# Altium PCB Mach_IO.PcbDoc (part 2 of 2)
Units mil, origin at the board's own origin, x right, y up, seen from the top; angles counter-clockwise.
Board outline 4965 x 4380 mil, 4 copper layers (Top Layer, Int1 (GND), Int2 (PWR), Bottom Layer), stack 53.912 mil thick; 148 components, 136 nets, 543 pads, 238 vias.
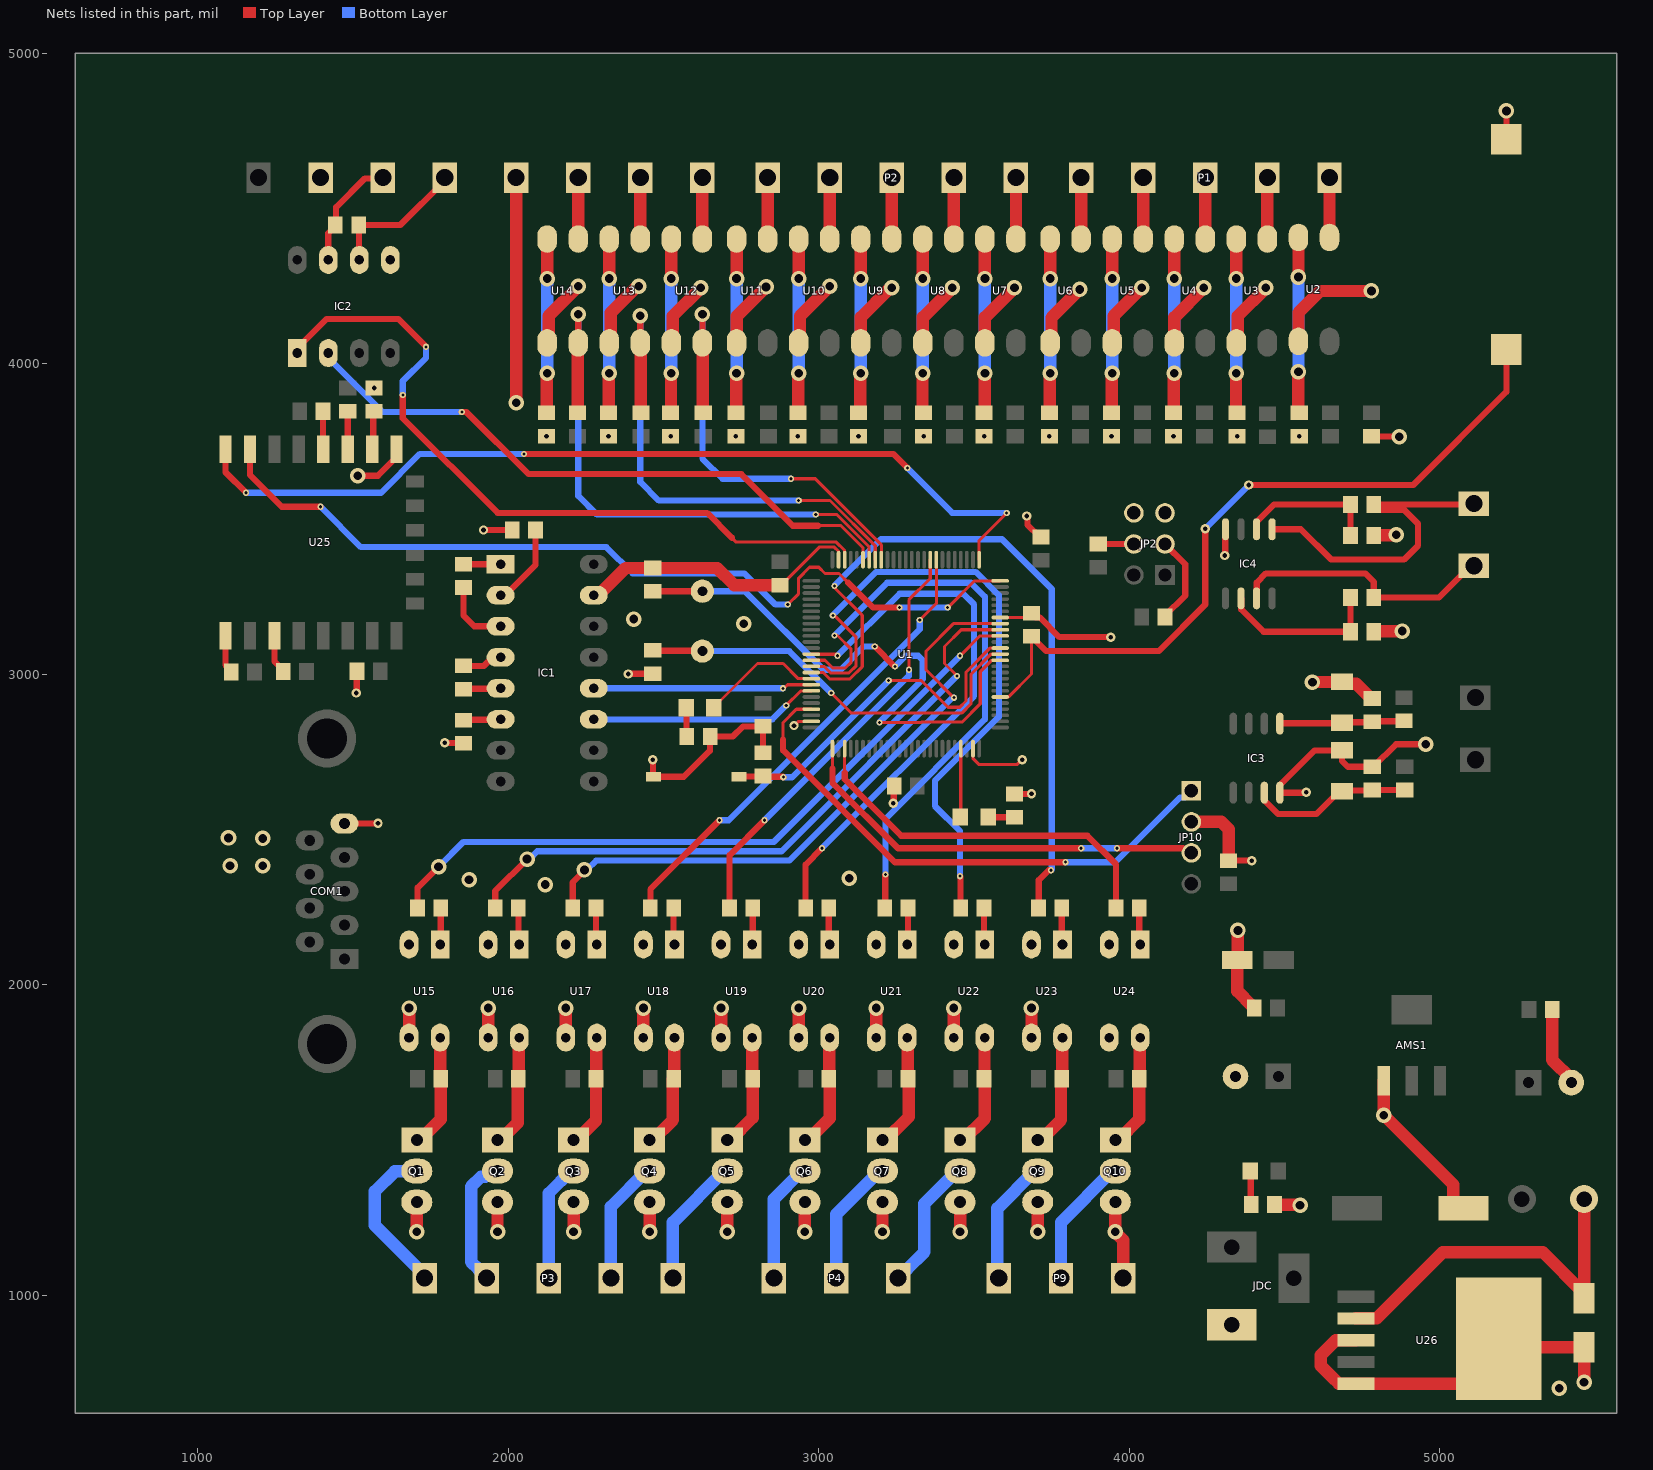
[diagram p4: the nets of this part, all layers, seen from the top]

## Via types
v1: diameter 20, hole 10, Top Layer to Bottom Layer, 63 vias
v2: diameter 50, hole 28, Top Layer to Bottom Layer, 54 vias
v3: diameter 50, hole 28, Top Layer to Int1 (GND), 44 vias
v4: diameter 30, hole 15, Top Layer to Int1 (GND), 29 vias
v5: diameter 30 (per signal layer), hole 15, Top Layer to Int2 (PWR), 19 vias
v6: diameter 50 (per signal layer), hole 28, Top Layer to Int2 (PWR), 15 vias
v7: diameter 30, hole 15, Top Layer to Bottom Layer, 10 vias
v8: diameter 50, hole 50, Top Layer to Bottom Layer, 2 vias
v9: diameter 20 (per signal layer), hole 10, Top Layer to Int2 (PWR), 1 vias
v10: diameter 50, hole 28, Top Layer to Int2 (PWR), 1 vias

## Nets (pads, with @x,y where several pads share a name; then routed paths per layer and width w, separated by ;. In a path a pad name is that pad's centre, name@x,y a point inside that pad or via, vN(x,y) a via of type N, cw(c..) or ccw(c..) an arc to the next point about the centre after c; other vN are vias at no path point) (continued)
DI_11: R25.1 U1.42 U12.4 | length 1523.2
  Top Layer w10: v1(2910,3630) 2988.39,3630 3201.26,3417.13 U1.42@3201.26,3369.13
  Top Layer w20: U12.4@2625,4067.68 v2(2625,4160) ; R25.1@2626.3,3843.53 R25.1@2627.61,3842.23
  Top Layer w40: U12.4@2625,4067.68 2626.3,4066.37 R25.1@2626.3,3843.53
  Bottom Layer w20: v2(2625,4160) 2625,3695 2690,3630 v1(2910,3630)
DI_12: R26.1 U1.43 U13.4 | length 1735.7
  Top Layer w10: v1(2935,3560) 3035.76,3560 3181.57,3414.19 U1.43@3181.57,3369.13
  Top Layer w20: U13.4@2425,4067.68 v2(2425,4155)
  Top Layer w40: U13.4@2425,4067.68 2426.3,4066.37 2426.3,3843.53 R26.1@2427.61,3842.23
  Bottom Layer w20: v2(2425,4155) 2425,3620 2485,3560 v1(2935,3560)
DI_13: R27.1 U1.44 U14.4 | length 1950.6
  Top Layer w10: v1(2990,3515) 3058.14,3515 3161.54,3411.59 3161.54,3369.48 U1.44@3161.89,3369.13
  Top Layer w20: U14.4@2225,4067.68 v2(2225,4160)
  Top Layer w40: R27.1@2222.61,3842.23 2223.8,3843.43 2223.8,4066.48 U14.4@2225,4067.68
  Bottom Layer w20: v2(2225,4160) 2225,3575 2285,3515 v1(2990,3515)
DO1: P3.5 Q1.2 | length 498.4
  Bottom Layer w40: Q1.2@1705,1400 1704.29,1399.29 1634.29,1399.29 1570,1335 1570,1224.84 P3.5@1730,1064.84
DO2: P3.4 Q2.2 | length 425.6
  Bottom Layer w40: P3.4@1930,1055 1930,1064.84 1910.63,1084.21 1903.43,1084.21 1880,1107.64 1880,1350 1911.79,1381.79 1925.97,1381.79 1944.18,1400 Q2.2@1965,1400
DO3: P3.3 Q3.2 | length 383.2
  Bottom Layer w40: P3.3@2130,1055 2130,1328.58 2201.42,1400 Q3.2@2210,1400
DO4: P3.2 Q4.2 | length 402.6
  Bottom Layer w40: P3.2@2330,1055 2330,1285 2445,1400 Q4.2@2455,1400
DO5: P3.1 Q5.2 | length 423.3
  Bottom Layer w40: P3.1@2530,1055 2530,1235 2695,1400 Q5.2@2705,1400
DO6: P4.3 Q6.2 | length 392.3
  Bottom Layer w40: P4.3@2855,1055 2855,1310 2945,1400 Q6.2@2955,1400
DO7: P4.2 Q7.2 | length 412.8
  Bottom Layer w40: P4.2@3055.5,1055 3055.5,1260.5 3195,1400 Q7.2@3205,1400
DO8: P4.1 Q8.2 | length 439.3
  Bottom Layer w40: P4.1@3255.5,1055 3255.5,1064.84 3274.87,1084.21 3284.71,1084.21 3340,1139.5 3340,1295 3445,1400 Q8.2@3455,1400
DO9: P9.3 Q9.2 | length 406.6
  Bottom Layer w40: P9.3@3579.5,1055 3575,1059.5 3575,1280 3695,1400 Q9.2@3705,1400
DO10: P9.2 Q10.2 | length 423.3
  Bottom Layer w40: P9.2@3780,1055 3780,1235 3945,1400 Q10.2@3955,1400
DO_1: R28.2 U1.16 | length 2277.9
  Top Layer w10: v1(3455,3060) 3519.06,3124.06 U1.16@3584.13,3124.06
  Top Layer w20: R28.2@1707.43,2247.39 1707.43,2312.43 v2(1775,2380)
  Bottom Layer w20: v2(1775,2380) 1855,2460 2855,2460 v1(3455,3060)
DO_2: R30.2 U1.17 | length 2142.4
  Top Layer w10: v1(3445,2995) 3405,3035 3405,3090 3458.74,3143.74 U1.17@3584.13,3143.74
  Top Layer w20: R30.2@1957.43,2247.39 1957.43,2302.43 v2(2060,2405)
  Bottom Layer w20: v2(2060,2405) 2068.12,2405 2093.12,2430 2880,2430 v1(3445,2995)
DO_3: R32.2 U1.18 | length 2021.1
  Top Layer w10: v1(3435,2925) 3345,3015 3345,3075 3433.43,3163.43 U1.18@3584.13,3163.43
  Top Layer w20: R32.2@2207.43,2247.39 2207.43,2329.79 2245,2367.37 v2(2245,2370)
  Bottom Layer w20: v2(2245,2370) 2253.12,2370 2283.12,2400 2905,2400 3430,2925 v1(3435,2925)
DO_4: R34.2 U1.33 | length 1520.8
  Top Layer w10: v1(3325,3175) 3378.43,3228.43 U1.33@3378.43,3369.13
  Top Layer w20: R34.2@2457.43,2247.39 2457.43,2307.43 v1(2680,2530)
  Bottom Layer w20: v1(2680,2530) 2710,2530 3325,3145 v1(3325,3175)
DO_5: R36.2 U1.34 | length 1389.5
  Top Layer w10: v1(3290,3015) 3290,3240 3358.74,3308.74 U1.34@3358.74,3369.13
  Top Layer w20: R36.2@2712.43,2247.39 2712.43,2417.43 v1(2825,2530)
  Bottom Layer w20: v1(2825,2530) 3290,2995 v1(3290,3015)
DO_6: R38.2 U1.63 | length 1825.9
  Top Layer w10: U1.63@2975.87,3065 2976.21,3064.65 3055.35,3064.65 v1(3060,3060)
  Top Layer w20: R38.2@2957.43,2247.39 2957.43,2387.43 v1(3010,2440)
  Bottom Layer w20: v1(3010,2440) 3500,2930 3500,3225 3465,3260 3260,3260 v1(3060,3060)
DO_7: R40.2 U1.64 | length 1970.2
  Top Layer w10: U1.64@2975.87,3045.31 3019.94,3045.31 3044.25,3021 3086,3021 3104,3039 3104,3081 3060,3125 v1(3050,3125)
  Top Layer w20: R40.2@3212.43,2247.39 3213.71,2248.68 3213.71,2353.71 v1(3215,2355)
  Bottom Layer w20: v1(3050,3125) 3220,3295 3490,3295 3535,3250 3535,2855 3215,2535 v1(3215,2355)
DO_8: R42.2 U1.65 | length 2110
  Top Layer w10: U1.65@2975.87,3025.63 2976.21,3025.28 3017.34,3025.28 3037.63,3005 3097.37,3005 3120,3027.63 3120,3120 3050,3190 v1(3045,3190)
  Top Layer w20: v1(3455,2350) 3456.21,2348.79 3456.21,2248.61 R42.2@3457.43,2247.39
  Bottom Layer w20: v1(3045,3190) 3185,3330 3505,3330 3580,3255 3580,2863.23 3374,2657.23 3374,2576 3455,2495 v1(3455,2350)
DO_9: R44.2 U1.66 | length 2364.6
  Top Layer w10: U1.66@2975.87,3005.94 3014.06,3005.94 3035,2985 3100,2985 3140,3025 3140,3190 3050,3280 v1(3050,3285)
  Top Layer w20: R44.2@3707.43,2247.39 3708.71,2248.68 3708.71,2337.35 3740.37,2369 v1(3747.77,2369)
  Bottom Layer w20: v1(3050,3285) 3200,3435 3590,3435 3750,3275 3750,2371.23 v1(3747.77,2369)
DO_10: R46.2 U1.78 | length 1227.1
  Top Layer w10: 3083.15,2683.15 U1.78@3083.15,2760.87
  Top Layer w20: 3083.15,2683.15 3083.15,2661.85 3265,2480 3865,2480 3957.43,2387.57 R46.2@3957.43,2247.39
EN: R51.2 U25.3 | length 126.6
  Top Layer w20: U25.3@1246.26,3124.61 1246.26,3042.12 1274.65,3013.72 R51.2@1274.65,3009.79
ERR: L1.1 U1.67 | length 394.4
  Top Layer w10: L1.1@2662.23,2892.39 2662.23,2894.89 2802.33,3035 2885,3035 2933.74,2986.26 U1.67@2975.87,2986.26
ESP_RX: U1.25 U25.21 | length 2840.6
  Top Layer w10: v1(2900,3225) 2935,3260 2935,3310 2970,3345 3000,3345 3020,3325 3065,3325 3095,3295 ; v1(3415,3215) 3501.22,3301.22 U1.25@3584.13,3301.22
  Top Layer w20: U25.21@1167.52,3725 1167.52,3642.48 1270,3540 v1(1395,3540) ; 3095,3295 3175,3215 v1(3260,3215)
  Bottom Layer w20: v1(1395,3540) 1525,3410 2315,3410 2400,3325 2760,3325 2860,3225 v1(2900,3225) ; v1(3260,3215) v1(3415,3215)
ESP_TX: U1.26 U25.22 | length 2935.5
  Top Layer w10: U1.26@3516.22,3369.13 3516.22,3431.22 v1(3605,3520)
  Top Layer w20: U25.22@1088.78,3725 1088.78,3651.22 v1(1155,3585) ; v1(2050,3710) 3240,3710 v1(3285,3665)
  Bottom Layer w20: v1(1155,3585) 1590,3585 1715,3710 v1(2050,3710) ; v1(3285,3665) 3430,3520 v1(3605,3520)
GND: AMS1.1 BT1.2 BT2.1 C1.2 C2.2 C3.2 C4.2 C5.2 C6.2 C7.2 C8.2 C9.1 C10.2 C11.2 C13.1 C14.2 C16.2 C17.1 C18.2 C19.2 C20.1 C21.1 COM1.5 D1.1 D2.1 D3.1 IC1.15 IC2.5 IC3.4 IC4.4 JDC.2 JP2.3 JP2.4 JP10.2 pad.2@1395,4600 R53.1 R56.1 R57.1 R58.2 R61.1 R62.2 R63.2 R64.2 U1.19 U1.49 U1.74 U1.99 U2.3 U3.3 U4.3 U5.3 U6.3 U7.3 U8.3 U9.3 U10.3 U11.3 U12.3 U13.3 U14.3 U15.2 U16.2 U17.2 U18.2 U19.2 U20.2 U21.2 U22.2 U23.2 U24.2 U25.15 U26.3 U26.5 U26.6 | length 9974
  Top Layer w10: C2.2@2874.87,3287.43 2878.8,3287.43 3001.38,3410 3050,3410 3063.12,3396.88 3063.12,3369.48 U1.49@3063.46,3369.13 ; v4(2920,2835) 2921.63,2835 2935.1,2848.46 U1.74@2975.87,2848.46 ; U1.99@3496.54,2760.87 3496.88,2760.52 3496.88,2728.12 3515,2710 3639.14,2710 3654.14,2725 v4(3655,2725) ; U1.19@3584.13,3183.11 3670.75,3183.11 C21.1@3684.87,3197.23
  Top Layer w20: COM1.5@1471.81,2519.53 1472.05,2519.76 1579.76,2519.76 v4(1580,2520) ; v4(1510,2940) 1511.21,2941.21 1511.21,3008.92 C7.2@1512.43,3010.13 ; v3(1515,3640) 1579.57,3640 1639.96,3700.39 U25.15@1639.96,3725 ; v4(1795,2780) 1796.11,2778.89 1854.02,2778.89 C13.1@1855.13,2777.77 ; v4(1920,3465) 1920.07,3465.07 C14.2@2012.43,3465.13 C14.2@2012.43,3465.13 ; v4(2386.51,3001.02) 2387.21,3001.72 2464.16,3001.72 C11.2@2464.87,3002.43 ; v4(2465,2725) 2466.1,2723.9 2466.1,2671.1 BT2.1@2467.2,2670 2565,2670 2649.16,2754.16 2649.16,2799.35 R62.2@2649.8,2800 2723.46,2800 2755.89,2832.43 C4.2@2819.87,2832.43 C9.1@2819.87,2747.23 ; v4(3240,2585) 3241.21,2586.21 3241.21,2638.92 C5.2@3242.43,2640.13 ; R63.2@3630,2614.8 3630.1,2614.9 3684.9,2614.9 v4(3685,2615) ; v4(3670,3510) 3671.91,3508.09 3671.91,3481.86 3711.2,3442.57 C3.2@3715.13,3442.57 ; C21.1@3684.87,3197.23 3698.49,3183.61 3711.39,3183.61 3775,3120 v4(3940,3120) ; v4(4307.42,3382.79) 4309.31,3384.67 4309.31,3466.75 IC4.4@4310,3467.44 ; C8.2@4320,2400 v4(4395,2400) ; v4(4570,2620) 4565,2620 4563.78,2618.78 IC3.4@4485,2618.78 4485,2642.4 4597.6,2755 4684.06,2755 D1.1@4685,2755.94 4685,2721.72 4704.49,2702.23 R56.1@4782.61,2702.23 ; R56.1@4775.87,2712.91 4786.54,2702.23 4859.31,2775 v3(4955,2775) ; C6.2@4779.87,3767.43 4781.08,3766.21 4868.79,3766.21 v3(4870,3765) ; BT1.2@5215,4723.58 v3(5215,4815)
  Top Layer w40: U14.3@2125,4067.68 2129.4,4072.08 2129.4,4154.4 v3(2225,4250) ; IC1.15@2275,3255 2290,3255 2377.57,3342.57 C10.2@2465.13,3342.57 2672.43,3342.57 2727.57,3287.43 C2.2@2874.87,3287.43 ; U13.3@2325,4067.68 2329.4,4072.08 2329.4,4164.4 v3@2410,4245 ; U12.3@2525,4067.68 2529.4,4072.08 2529.4,4154.4 v3@2615,4240 ; U11.3@2735,4067.68 2735,4152.91 2827.09,4245 v3@2830,4245 ; U10.3@2935,4067.68 2939.4,4072.08 2939.4,4154.4 v3(3035,4250) ; U9.3@3135,4067.68 3135,4150 v3@3225,4240 ; U8.3@3335,4067.68 3335,4150 v3(3430,4245) ; U7.3@3535,4067.68 3535,4150 v3(3630,4245) ; U6.3@3745,4067.68 3749.4,4072.08 3749.4,4149.4 v3(3840,4240) ; U5.3@3945,4067.68 3949.4,4072.08 3949.4,4154.4 v3(4040,4245) ; U4.3@4145,4067.68 4145,4150 v3(4240,4245) ; JP10.2@4200,2525 4296.57,2525 4320,2501.57 C8.2@4320,2400 ; C19.2@4335,1697.8 C19.2@4342.2,1705 ; U3.3@4345,4067.68 4349.4,4072.08 4349.4,4154.4 v3(4440,4245) ; v3(4350,2175) 4349.04,2174.04 4349.04,2080.96 C1.2@4348.07,2080 4348.07,1979.57 4395.21,1932.43 4399.15,1932.43 4402.77,1928.8 C20.1@4402.77,1924.87 ; R64.2@4467.57,1292.61 4468.88,1291.3 4548.7,1291.3 v3(4550,1290) ; U2.3@4545,4072.68 4545,4165 4615,4235 v3(4780,4235) ; v3(4590,2975) 4590.47,2975.47 4684.53,2975.47 D2.1@4685,2975.94 4691.57,2969.37 4731.53,2969.37 4778.67,2922.23 R57.1@4782.61,2922.23 ; U26.3@4730,855 4729.69,854.69 4664.69,854.69 4616.57,806.57 4616.57,773.43 4654.69,735.31 4675,715 U26.5@4730,715 5072.2,715 5190,832.8 U26.6@5190,860 5217.48,832.52 D3.1@5465,832.52 v3(5465,720) ; R61.1@4787.23,3137.39 4788.3,3138.46 4878.46,3138.46 v3(4879.53,3139.53) ; R58.2@4787.57,3447.61 4788.54,3448.57 4858.57,3448.57 v3(4859.53,3449.53) ; AMS1.1@4819.13,1690.51 AMS1.1@4819.45,1690.83 4819.72,1690.55 4819.72,1580.28 5044.06,1355.94 5044.06,1299.37 5056.89,1299.37 C18.2@5076.26,1280 ; C17.1@5362.23,1920.13 5362.23,1758.22 5423.9,1696.55 C16.2@5423.9,1685
  other v2: 5385,700 2118.37,2323.06 1873.37,2338.06 3098.37,2343.06 1103.37,2383.06 1208.37,2383.06 1208.29,2471.5 1098.37,2473.06 2758.37,3163.06 2403.37,3178.06
  other v3: 4820,1580 2620,4245 3235,4245 2829.98,4247.89 2420,4250
  other v4: 1567.61,3922.23
GND_CL_DI: pad.1@2025,4600 R2.2 R3.2 R4.2 R5.2 R6.2 R7.2 R8.2 R9.2 R10.2 R11.2 R12.2 R13.2 R14.2 | length 725
  Top Layer w40: v3(2025,3875) pad.1@2025,4600
  other v4: 2122.61,3767.43 2322.61,3767.43 2522.61,3767.43 2732.61,3767.43 2932.61,3767.43 3127.61,3767.43 3337.61,3767.43 3532.61,3767.43 3742.61,3767.43 3942.61,3767.43 4142.61,3767.43 4347.61,3767.43 4547.61,3767.43
GND_CL_DO: P9.1 Q1.3 Q2.3 Q3.3 Q4.3 Q5.3 Q6.3 Q7.3 Q8.3 Q9.3 Q10.3 U15.3 U16.3 U17.3 U18.3 U19.3 U20.3 U21.3 U22.3 U23.3 U24.3 | length 1965.4
  Top Layer w40: U15.3@1680,1830 v3(1680,1925) ; v3(1705,1205) Q1.3@1705,1300 ; U16.3@1935,1830 v3(1935,1925) ; v3(1965,1205) Q2.3@1965,1300 ; U17.3@2185,1830 v3(2185,1925) ; v3(2210,1205) Q3.3@2210,1300 ; U18.3@2435,1830 v3(2435,1925) ; v3(2455,1205) Q4.3@2455,1300 ; U19.3@2685,1830 v3(2685,1925) ; v3(2705,1205) Q5.3@2705,1300 ; U20.3@2935,1830 v3(2935,1925) ; v3(2955,1205) Q6.3@2955,1300 ; U21.3@3185,1830 v3(3185,1925) ; v3(3205,1205) Q7.3@3205,1300 ; U22.3@3435,1830 v3(3435,1925) ; v3(3455,1205) Q8.3@3455,1300 ; U23.3@3685,1830 v3(3685,1925) ; v3(3705,1205) Q9.3@3705,1300 ; Q10.3@3955,1300 v3(3955,1205) 3955,1202.29 3980,1177.29 P9.1@3980,1055
GPIO0: R49.2 U25.18 | length 123.1
  Top Layer w20: R49.2@1402.57,3847.61 1403.16,3847.02 1403.16,3725.58 U25.18@1403.74,3725
GPIO2: R50.2 U25.17 | length 122.5
  Top Layer w20: U25.17@1482.48,3725 1482.54,3725.06 1482.54,3847.36 R50.2@1482.61,3847.43
GPIO15: R53.2 U25.16 | length 125.1
  Top Layer w20: U25.16@1561.22,3725 1564.41,3728.19 1564.41,3844.23 R53.2@1567.61,3847.43
IN1: P1.5 U2.1 | length 192.7
  Top Layer w40: U2.1@4645,4407.32 P1.5@4645,4600
IN2: P1.4 U3.1 | length 197.7
  Top Layer w40: U3.1@4445,4402.32 P1.4@4445,4600
IN3: P1.3 U4.1 | length 197.7
  Top Layer w40: U4.1@4245,4402.32 P1.3@4245,4600
IN4: P1.2 U5.1 | length 197.7
  Top Layer w40: U5.1@4045,4402.32 P1.2@4045,4600
IN5: P1.1 U6.1 | length 197.7
  Top Layer w40: U6.1@3845,4402.32 P1.1@3845,4600
IN6: P2.5 U7.1 | length 197.7
  Top Layer w40: U7.1@3635,4402.32 P2.5@3635,4600
IN7: P2.4 U8.1 | length 197.7
  Top Layer w40: U8.1@3435,4402.32 P2.4@3435,4600
IN8: P2.3 U9.1 | length 197.7
  Top Layer w40: U9.1@3235,4402.32 P2.3@3235,4600
IN9: P2.2 U10.1 | length 197.7
  Top Layer w40: U10.1@3035,4402.32 P2.2@3035,4600
IN10: P2.1 U11.1 | length 197.7
  Top Layer w40: U11.1@2835,4402.32 P2.1@2835,4600
IN11: pad.4@2625,4600 U12.1 | length 197.7
  Top Layer w40: U12.1@2625,4402.32 pad.4@2625,4600
IN12: pad.3@2425,4600 U13.1 | length 197.7
  Top Layer w40: U13.1@2425,4402.32 pad.3@2425,4600
IN13: pad.2@2225,4600 U14.1 | length 197.7
  Top Layer w40: U14.1@2225,4402.32 pad.2@2225,4600
INA+: D1.2 IC3.3 R54.1 R56.2 | length 526.9
  Top Layer w20: IC3.3@4435,2618.78 4435,2595.16 4480.16,2550 4602.09,2550 4676.14,2624.06 D1.2@4685,2624.06 4686.69,2625.74 4780.92,2625.74 R56.2@4782.61,2627.43 4782.78,2627.6 4887.22,2627.6 R54.1@4887.39,2627.77
INB+: D2.2 IC3.5 R55.1 R57.2 | length 403.7
  Top Layer w20: IC3.5@4485,2841.22 4486.42,2842.64 4683.58,2842.64 D2.2@4685,2844.06 4686.69,2845.74 4780.92,2845.74 R57.2@4782.61,2847.43 4783.99,2848.81 4883.61,2848.81 R55.1@4885,2850.2
NetBT1_1: BT1.1 C21.2 U1.6 | length 2429.4
  Top Layer w10: U1.6@3584.13,2927.2 3584.48,2927.55 3611.34,2927.55 3684.87,3001.08 C21.2@3684.87,3122.43
  Top Layer w20: C21.2@3684.87,3122.43 3732.29,3075 4095,3075 4245,3225 v7@4245,3470 ; v7(4385,3610) 4915,3610 5215,3910 BT1.1@5215,4046.42
  Bottom Layer w20: v7(4245.15,3468.78) 4245.15,3469.46 4385,3609.32 v7(4385,3610)
NetC12_1: C12.1 IC1.1 | length 120.1
  Top Layer w20: C12.1@1855,3354.8 1974.8,3354.8 IC1.1@1975,3355
NetC12_2: C12.2 IC1.3 | length 224.5
  Top Layer w20: C12.2@1855,3280 1855,3190 1890,3155 IC1.3@1975,3155
NetC13_2: C13.2 IC1.6 | length 120.9
  Top Layer w20: C13.2@1855.13,2852.57 1856.35,2853.79 1973.79,2853.79 IC1.6@1975,2855
NetC14_1: C14.1 IC1.2 | length 265.4
  Top Layer w20: IC1.2@1975,3255 1990,3255 2087.23,3352.23 C14.1@2087.23,3465.13
NetC15_1: C15.1 IC1.4 | length 131.6
  Top Layer w20: C15.1@1854.87,3027.23 1921.4,3027.23 1949.18,3055 IC1.4@1975,3055
NetC15_2: C15.2 IC1.5 | length 121.2
  Top Layer w20: C15.2@1854.87,2952.43 1856.15,2953.71 1973.71,2953.71 IC1.5@1975,2955
NetD3_2: D3.2 L3.1 U26.2 | length 1198.6
  Top Layer w40: U26.2@4730,925 4730.31,925.31 4796.57,925.31 5010,1138.75 5332,1138.75 D3.2@5465,1005.75 ; D3.2@5465,990 D3.2@5465,1005.75 ; L3.1@5465,1310 D3.2@5465,1005.75
NetIC2_6: IC2.6 pad.4@1795,4600 R48.2 | length 459.9
  Top Layer w20: IC2.6@1520,4335 1518.79,4336.21 1518.79,4446.39 R48.2@1517.57,4447.61 1652.45,4447.61 1795,4590.16 pad.4@1795,4600
NetIC2_7: IC2.7 pad.3@1595.5,4600 R48.1 | length 369.9
  Top Layer w20: IC2.7@1420,4335 1420,4420.9 1442.77,4443.67 R48.1@1442.77,4447.61 1445,4449.83 1445,4504.45 1537.85,4597.3 1592.8,4597.3 pad.3@1595.5,4600
NetIC4_2: IC4.2 R58.1 R59.1 | length 449.8
  Top Layer w20: IC4.2@4410,3467.44 4410,3491.06 4466.54,3547.61 R59.1@4712.77,3547.61 R58.1@4712.77,3447.61
NetIC4_6: IC4.6 R60.2 R61.2 | length 527.5
  Top Layer w20: IC4.6@4360,3245 4360.69,3244.31 4360.69,3209.31 4432.61,3137.39 R61.2@4712.43,3137.39 R60.2@4712.43,3247.39
NetJP2_2: JP2.2 R65.2 | length 288.8
  Top Layer w20: R65.2@4115,3185 4115,3188.94 4180,3253.94 4180,3355 JP2.2@4115,3420
NetJP2_5: JP2.5 R66.1 | length 115
  Top Layer w20: R66.1@3900,3420 JP2.5@4015,3420
NetL1_2: L1.2 R62.1 | length 93.5
  Top Layer w20: L1.2@2572.23,2892.39 2573.61,2891.01 2573.61,2801.39 R62.1@2575,2800
NetL2_2: L2.2 R63.1 | length 85
  Top Layer w20: L2.2@3545,2540 R63.1@3630,2540
NetL4_2: L4.2 R64.1 | length 108.5
  Top Layer w20: L4.2@4390,1400 4391.39,1398.61 4391.39,1293.99 R64.1@4392.77,1292.61
NetQ1_1: Q1.1 R29.1 U15.4 | length 368.8
  Top Layer w40: Q1.1@1705,1500 1715,1500 1782.23,1567.23 R29.1@1782.23,1697.39 1781.11,1698.51 1781.11,1828.89 U15.4@1780,1830
NetQ2_1: Q2.1 R31.1 U16.4 | length 364.9
  Top Layer w40: Q2.1@1965,1500 1975,1500 2030,1555 2030,1695.17 R31.1@2032.23,1697.39 2033.61,1698.78 2033.61,1828.61 U16.4@2035,1830
NetQ3_1: Q3.1 R33.1 U17.4 | length 366.9
  Top Layer w40: Q3.1@2210,1500 2220,1500 2282.23,1562.23 R33.1@2282.23,1697.39 2283.61,1698.78 2283.61,1828.61 U17.4@2285,1830
NetQ4_1: Q4.1 R35.1 U18.4 | length 369
  Top Layer w40: Q4.1@2455,1500 2465,1500 2530,1565 2530,1695.17 R35.1@2532.23,1697.39 2533.61,1698.78 2533.61,1828.61 U18.4@2535,1830
NetQ5_1: Q5.1 R37.1 U19.4 | length 370.8
  Top Layer w40: Q5.1@2705,1500 2715,1500 2787.23,1572.23 R37.1@2787.23,1697.39 2786.11,1698.51 2786.11,1828.89 U19.4@2785,1830
NetQ6_1: Q6.1 R39.1 U20.4 | length 371.3
  Top Layer w40: Q6.1@2955,1500 2965,1500 3035,1570 3035,1694.62 R39.1@3032.23,1697.39 3033.61,1698.78 3033.61,1828.61 U20.4@3035,1830
NetQ7_1: Q7.1 R41.1 U21.4 | length 373.1
  Top Layer w40: Q7.1@3205,1500 3215,1500 3290,1575 3290,1694.62 R41.1@3287.23,1697.39 3286.11,1698.51 3286.11,1828.89 U21.4@3285,1830
NetQ8_1: Q8.1 R43.1 U22.4 | length 371.3
  Top Layer w40: Q8.1@3455,1500 3465,1500 3535,1570 3535,1694.62 R43.1@3532.23,1697.39 3533.61,1698.78 3533.61,1828.61 U22.4@3535,1830
NetQ9_1: Q9.1 R45.1 U23.4 | length 369
  Top Layer w40: Q9.1@3705,1500 3715,1500 3780,1565 3780,1695.17 R45.1@3782.23,1697.39 3783.61,1698.78 3783.61,1828.61 U23.4@3785,1830
NetQ10_1: Q10.1 R47.1 U24.4 | length 369
  Top Layer w40: Q10.1@3955,1500 3965,1500 4032.23,1567.23 R47.1@4032.23,1697.39 4033.61,1698.78 4033.61,1828.61 U24.4@4035,1830
NetR2_1: R2.1 U2.2 | length 557.7
  Top Layer w40: R2.1@4543.8,3848.43 v2@4543.8,3973.8 ; v2(4545,4280) U2.2@4545,4407.32
  Bottom Layer w40: v2(4545,3975) v2(4545,4280)
NetR3_1: R3.1 U3.2 | length 557.7
  Top Layer w40: R3.1@4343.8,3843.43 v2@4343.8,3968.8 ; v2(4345,4275) U3.2@4345,4402.32
  Bottom Layer w40: v2(4345,3970) v2(4345,4275)
NetR4_1: R4.1 U4.2 | length 557.7
  Top Layer w40: R4.1@4143.8,3843.43 v2@4143.8,3968.8 ; v2(4145,4275) U4.2@4145,4402.32
  Bottom Layer w40: v2(4145,3970) v2(4145,4275)
NetR5_1: R5.1 U5.2 | length 557.7
  Top Layer w40: R5.1@3943.8,3843.43 v2@3943.8,3968.8 ; v2(3945,4275) U5.2@3945,4402.32
  Bottom Layer w40: v2(3945,3970) v2(3945,4275)
NetR6_1: R6.1 U6.2 | length 557.7
  Top Layer w40: R6.1@3743.8,3843.43 v2@3743.8,3968.8 ; v2(3745,4275) U6.2@3745,4402.32
  Bottom Layer w40: v2(3745,3970) v2(3745,4275)
NetR7_1: R7.1 U7.2 | length 557.7
  Top Layer w40: R7.1@3533.8,3843.43 v2@3533.8,3968.8 ; v2(3535,4275) U7.2@3535,4402.32
  Bottom Layer w40: v2(3535,3970) v2(3535,4275)
NetR8_1: R8.1 U8.2 | length 557.7
  Top Layer w40: R8.1@3333.8,3843.43 v2@3333.8,3968.8 ; v2(3335,4275) U8.2@3335,4402.32
  Bottom Layer w40: v2(3335,3970) v2(3335,4275)
NetR9_1: R9.1 U9.2 | length 566.5
  Top Layer w20: R9.1@3127.61,3842.23 R9.1@3133.8,3848.43
  Top Layer w40: R9.1@3133.8,3843.43 v2@3133.8,3968.8 ; v2(3135,4275) U9.2@3135,4402.32
  Bottom Layer w40: v2(3135,3970) v2(3135,4275)
NetR10_1: R10.1 U10.2 | length 557.7
  Top Layer w40: R10.1@2933.8,3843.43 v2@2933.8,3968.8 ; v2(2935,4275) U10.2@2935,4402.32
  Bottom Layer w40: v2(2935,3970) v2(2935,4275)
NetR11_1: R11.1 U11.2 | length 557.7
  Top Layer w40: R11.1@2733.8,3843.43 v2@2733.8,3968.8 ; v2(2735,4275) U11.2@2735,4402.32
  Bottom Layer w40: v2(2735,3970) v2(2735,4275)
NetR12_1: R12.1 U12.2 | length 557.7
  Top Layer w40: R12.1@2523.8,3843.43 v2@2523.8,3968.8 ; v2(2525,4275) U12.2@2525,4402.32
  Bottom Layer w40: v2(2525,3970) v2(2525,4275)
NetR13_1: R13.1 U13.2 | length 561.1
  Top Layer w20: R13.1@2322.61,3842.23 R13.1@2323.8,3843.43 ; 2323.8,3928.8 2325,3930
  Top Layer w40: R13.1@2323.8,3843.43 v2@2323.8,3968.8 ; v2(2325,4275) U13.2@2325,4402.32
  Bottom Layer w40: v2(2325,3970) v2(2325,4275)
NetR14_1: R14.1 U14.2 | length 561.1
  Top Layer w40: R14.1@2122.61,3842.23 2123.8,3843.43 2123.8,3968.8 v2(2125,3970) ; v2(2125,4275) U14.2@2125,4402.32
  Bottom Layer w40: v2(2125,3970) v2(2125,4275)
NetR28_1: R28.1 U15.1 | length 118.3
  Top Layer w20: U15.1@1780,2130 1782.23,2132.23 R28.1@1782.23,2247.39
NetR30_1: R30.1 U16.1 | length 118.5
  Top Layer w20: R30.1@2032.23,2247.39 2032.23,2132.77 U16.1@2035,2130
NetR32_1: R32.1 U17.1 | length 118.5
  Top Layer w20: R32.1@2282.23,2247.39 2282.23,2132.77 U17.1@2285,2130
NetR34_1: R34.1 U18.1 | length 118.5
  Top Layer w20: R34.1@2532.23,2247.39 2532.23,2132.77 U18.1@2535,2130
NetR36_1: R36.1 U19.1 | length 118.3
  Top Layer w20: U19.1@2785,2130 2787.23,2132.23 R36.1@2787.23,2247.39
NetR38_1: R38.1 U20.1 | length 118.5
  Top Layer w20: R38.1@3032.23,2247.39 3032.23,2132.77 U20.1@3035,2130
NetR40_1: R40.1 U21.1 | length 118.3
  Top Layer w20: U21.1@3285,2130 3287.23,2132.23 R40.1@3287.23,2247.39
NetR42_1: R42.1 U22.1 | length 118.5
  Top Layer w20: R42.1@3532.23,2247.39 3532.23,2132.77 U22.1@3535,2130
NetR44_1: R44.1 U23.1 | length 118.5
  Top Layer w20: R44.1@3782.23,2247.39 3782.23,2132.77 U23.1@3785,2130
NetR46_1: R46.1 U24.1 | length 118.5
  Top Layer w20: R46.1@4032.23,2247.39 4032.23,2132.77 U24.1@4035,2130
NRST: BT2.2 C9.2 U1.14 | length 1141.9
  Top Layer w10: v1(3225,2980) 3330,2980 3415.86,2894.14 3454.14,2894.14 3474,2914 3474,3007.3 3551.04,3084.34 3583.79,3084.34 U1.14@3584.13,3084.68
  Top Layer w20: BT2.2@2742.8,2670 2744.01,2671.21 2818.65,2671.21 C9.2@2819.87,2672.43 2822.29,2670 2884.42,2670 v1(2885.6,2668.83)
  Bottom Layer w20: v1(2885.6,2668.83) 2913.83,2668.83 v1(3225,2980)
OUT1: IC4.1 P7.1 R59.2 | length 1093.1
  Top Layer w20: IC4.1@4460,3467.44 4552.56,3467.44 4650,3370 4885,3370 4930,3415 4930,3485 4884.95,3530.05 4801.2,3530.05 4787.57,3543.67 R59.2@4787.57,3547.61 5107.61,3547.61 P7.1@5110,3550
OUT2: IC4.7 P7.2 R60.1 | length 866.6
  Top Layer w20: IC4.7@4410,3245 4410.69,3245.69 4410.69,3295.69 4440,3325 4760,3325 4787.23,3297.77 R60.1@4787.23,3247.39 4997.55,3247.39 5100.16,3350 P7.2@5110,3350
RE: IC2.2 U1.45 | length 2029.7
  Top Layer w10: 2996.98,3479 3071.51,3479 3141.86,3408.65 3141.86,3369.48 U1.45@3142.2,3369.13
  Top Layer w20: v1(1850,3845) 1865,3845 2065,3645 2750,3645 2916,3479 2996.98,3479
  Bottom Layer w20: IC2.2@1420,4035 1420,4020 1595,3845 v1(1850,3845)
RO: IC2.1 U1.48 | length 2397.4
  Top Layer w10: 2720,3440 2734,3426 3056.63,3426 3082.8,3399.82 3082.8,3369.48 U1.48@3083.15,3369.13
  Top Layer w20: IC2.1@1320,4035 1320,4050 1415,4145 1645,4145 v1(1735,4055) ; v1(1660,3900) 1660,3825 1965,3520 2640,3520 2720,3440
  Bottom Layer w20: v1(1660,3900) 1660,3945 1735,4020 v1(1735,4055)
RS232_RX: IC1.12 U1.68 | length 705.7
  Top Layer w10: v1(2885,2955) 2887.71,2955 2899.28,2966.57 U1.68@2975.87,2966.57
  Bottom Layer w20: IC1.12@2275,2955 v1(2885,2955)
RS232_TX: IC1.11 U1.69 | length 738.9
  Top Layer w10: v1(2895,2900) 2941.54,2946.54 2975.52,2946.54 U1.69@2975.87,2946.89
  Bottom Layer w20: IC1.11@2275,2855 2850,2855 v1(2895,2900)
RST: R52.2 U25.1 | length 124.9
  Top Layer w20: U25.1@1088.78,3124.61 1088.78,3029.98 1107.43,3011.33 R52.2@1107.43,3007.39
RUN: L2.1 U1.97 | length 221.8
  Top Layer w10: L2.1@3455,2540 3457.17,2542.17 U1.97@3457.17,2760.87
SWCLK: JP10.3 U1.76 | length 1359.6
  Top Layer w10: 3043.78,2696.22 U1.76@3043.78,2760.87
  Top Layer w20: 3043.78,2696.22 3043.78,2651.22 3255,2440 v1(3845,2440) ; v1(3960,2440) 4173.37,2440 4188.37,2425 JP10.3@4200,2425
  Bottom Layer w20: v1(3845,2440) v1(3960,2440)
SWDIO: JP10.1 U1.72 | length 1758
  Top Layer w10: 2885,2790 2885,2845 2927.49,2887.49 2975.52,2887.49 U1.72@2975.87,2887.83
  Top Layer w20: 2885,2790 2885,2755 3245,2395 v1(3795,2395)
  Bottom Layer w20: v1(3795,2395) 3955,2395 4163.5,2603.5 4178.5,2603.5 JP10.1@4200,2625
XTAL1: C10.1 U1.12 Y1.2 | length 1843.8
  Top Layer w10: v1(3195,2845) 3329.81,2845 3330.81,2846 3461,2846 3520,2905 3520,3008.04 3556.93,3044.97 3583.79,3044.97 U1.12@3584.13,3045.31
  Top Layer w20: C10.1@2465.13,3267.77 2465.2,3267.84 2624.93,3267.84 Y1.2@2625,3267.91 ; v1(3180,3090) v1(3245,3025)
  Bottom Layer w20: Y1.2@2625,3267.91 2762.09,3267.91 3015,3015 3070,3015 3145,3090 v1(3180,3090) ; v1(3195,2845) 3335,2985 3335,3045 3320,3060 3280,3060 v1(3245,3025)
XTAL2: C11.1 U1.13 Y1.1 | length 1337.8
  Top Layer w10: v1(3040,2940) 3105,2875 3460,2875 3490,2905 3490,3000.67 3553.98,3064.65 3583.79,3064.65 U1.13@3584.13,3065
  Top Layer w20: C11.1@2464.87,3077.23 2465.98,3076.11 2623.89,3076.11 Y1.1@2625,3075
  Bottom Layer w20: Y1.1@2625,3075 2905,3075 v1(3040,2940)
pads on no net: COM1.1 COM1.4 COM1.6 COM1.7 COM1.8 COM1.9 COM1.10 COM1.11 IC1.7 IC1.8 IC1.9 IC1.10 JDC.3 U1.7 U1.8 U1.9 U1.10 U1.11 U1.15 U1.20 U1.21 U1.27 U1.28 U1.31 U1.32 U1.35 U1.36 U1.51 U1.52 U1.53 U1.54 U1.55 U1.56 U1.57 U1.58 U1.59 U1.60 U1.61 U1.62 U1.70 U1.71 U1.73 U1.77 U1.79 U1.80 U1.81 U1.82 U1.83 U1.84 U1.85 U1.86 U1.87 U1.88 U1.89 U1.90 U1.91 U1.92 U1.93 U1.95 U1.96 U25.2 U25.4 U25.5 U25.6 U25.7 U25.9 U25.10 U25.11 U25.12 U25.13 U25.14 U25.19 U25.20
copper on no net:
  other v8: 5215.2,4244.1 5215,4543.5

## Polygon pours and split planes (outlines as drawn)
GND on Bottom Layer "GND_L04_P005" (solid, remove dead copper, pour order 5): 1020,3635 4250,3635 4250,2100 1020,2100
GND on Bottom Layer "GND_L04_P001" (solid, pour order 1): 4980,640 4980,855 5550,855 5550,640
GND_CL_DO on Bottom Layer "GND_CL_DO_L04_P004" (solid, remove dead copper, pour order 4): 1565,1600 4105,1600 4105,1130 1561.08,1130
GND on Top Layer "GND_L01_P000" (solid, pour order 0): 4975,850 4980,855 5550,855 5550,640 4980,640
GND on Top Layer "GND_L01_P002" (solid, remove dead copper, pour order 2): 1015,3615 4245,3615 4245,2080 1015,2080
24V on Int2 (PWR) (split plane): 5334.93,3205.07 4445.07,3205.07 4445.07,3334.93 5334.93,3334.93
no net on Int2 (PWR) (split plane): 5549.9,640.1 4950.1,640.1 4950.1,1619.9 5549.9,1619.9
24V on Int2 (PWR) (split plane): 4249.91,1240 4250.26,1237.39 4251.27,1234.96 4252.87,1232.87 4254.96,1231.27 4257.39,1230.26 4260,1229.91 4434.91,1229.91 4434.91,1075.09 4150.09,1075.09 4150.09,1625 4149.74,1627.61 4148.73,1630.04 4147.13,1632.13 4145.04,1633.73 4142.61,1634.74 4140,1635.09 1565.09,1635.09 1565.09,1749.91 4249.91,1749.91
3V3 on Int2 (PWR) (split plane): 5549.9,1630.1 4945,1630.1 4943.05,1629.71 4941.4,1628.6 4940.29,1626.95 4939.9,1625 4939.9,640.1 625.1,640.1 625.1,4979.9 5549.9,4979.9
GND on Int1 (GND) (split plane): 5549.9,1630.1 4945,1630.1 4943.05,1629.71 4941.4,1628.6 4940.29,1626.95 4939.9,1625 4939.9,760 4940.29,758.05 4941.4,756.4 4943.05,755.29 4945,754.9 5549.9,754.9 5549.9,640.1 625.1,640.1 625.1,4979.9 5549.9,4979.9
GND_CL_DO on Int1 (GND) (split plane): 4114.93,995.07 1540.07,995.07 1540.07,1150 1540.07,1950 1540.07,1959.93 4114.93,1959.93
GND on Int1 (GND) (split plane): 5549.9,765.1 4950.1,765.1 4950.1,1619.9 5549.9,1619.9
GND_CL_DI on Int1 (GND) (split plane): 4719.9,3655.1 1980.1,3655.1 1980.1,3914.9 4719.9,3914.9

## Other copper
Int1 (GND) (plane layer: these items are gaps in the copper):
  lines w10: 5550,1625 4945,1625 4945,760 5565,760 5565,765 5560,770 ; 1975,3650 4725,3650 4725,3920 1975,3920 1975,3650
  lines w30: 1525,980 1525,1150 1525,1950 1525,1975 4130,1975 4130,980 1525,980
Int2 (PWR) (plane layer: these items are gaps in the copper):
  lines w10: 4945,640 4945,1625 5550,1625
  lines w20: 1555,1625 4140,1625 4140,1065 4295,1065 4445,1065 4445,1240 4260,1240 4260,1760 4185,1760 1555,1760 1555,1625
  lines w30: 4430,3190 5350,3190 5350,3350 4430,3350 4430,3190

## Silkscreen, mask and mechanical layers (free items; w line width, h text height)
Top Overlay:
  lines w10: 1095,4520 1495,4520 ; 1095,4520 1695.5,4520 1095,4520 ; 1095,4520 1495,4520 ; 1095,4525 1095,5000.5 ; 1095,4525 1095,5000 ; 1095,4525 1095,5000.5 ; 1095,4525 1095,5000 ; 1095,5000 1895,5000 1095,5000 ; 1095,5000 1695.5,5000 1095,5000 ; 1095,5000.5 1095.5,5000.5 ; 1095,5000.5 1095.5,5000.5 ; 1095.5,5000.5 1895,5000.5 ; 1095.5,5000.5 1895,5000.5 ; 1495,4520 1895,4520 ; 1495,4520 1895,4520 ; 1895,4520 1895,5000.5 ; 1895,4520 1895,5000.5 ; 1925,4520 2325,4520 ; 1925,4520 2525.5,4520 1925,4520 ; 1925,4520 2325,4520 ; 1925,4525 1925,5000.5 ; 1925,4525 1925,5000 ; 1925,4525 1925,5000.5 ; 1925,4525 1925,5000 ; 1925,5000 2725,5000 1925,5000 ; 1925,5000 2525.5,5000 1925,5000 ; 1925,5000.5 1925.5,5000.5 ; 1925,5000.5 1925.5,5000.5 ; 1925.5,5000.5 2725,5000.5 ; 1925.5,5000.5 2725,5000.5 ; 2325,4520 2725,4520 ; 2325,4520 2725,4520 ; 2725,4520 2725,5000.5 ; 2725,4520 2725,5000.5

## Text inside footprints (layer, text, board x,y; h text height)
COM1: Top Overlay "1" at 1490.91,1986.42 h30 r90; Top Overlay "5" at 1490.91,2606.42 h30 r90; Top Overlay "9" at 1285.91,2456.42 h30 r90; Top Overlay "6" at 1285.91,2126.42 h30 r90; Top Overlay "FMALE" at 1130.91,2151.42 h30 r90
U25: Mechanical 13 "ANTENNA AREA" at 778.78,3114.84 h30 r90; Mechanical 13 "CUTOUT POLYGON" at 798.78,3114.84 h30 r90